# Altium PCB Mega2560_Custom.PcbDoc (part 1 of 6)
Units mil, origin at the board's own origin, x right, y up, seen from the top; angles counter-clockwise.
Board outline 4742.41 x 2889.95 mil, 2 copper layers (Top Layer, Bottom Layer), stack 57 mil thick; 215 components, 134 nets, 793 pads, 779 vias.
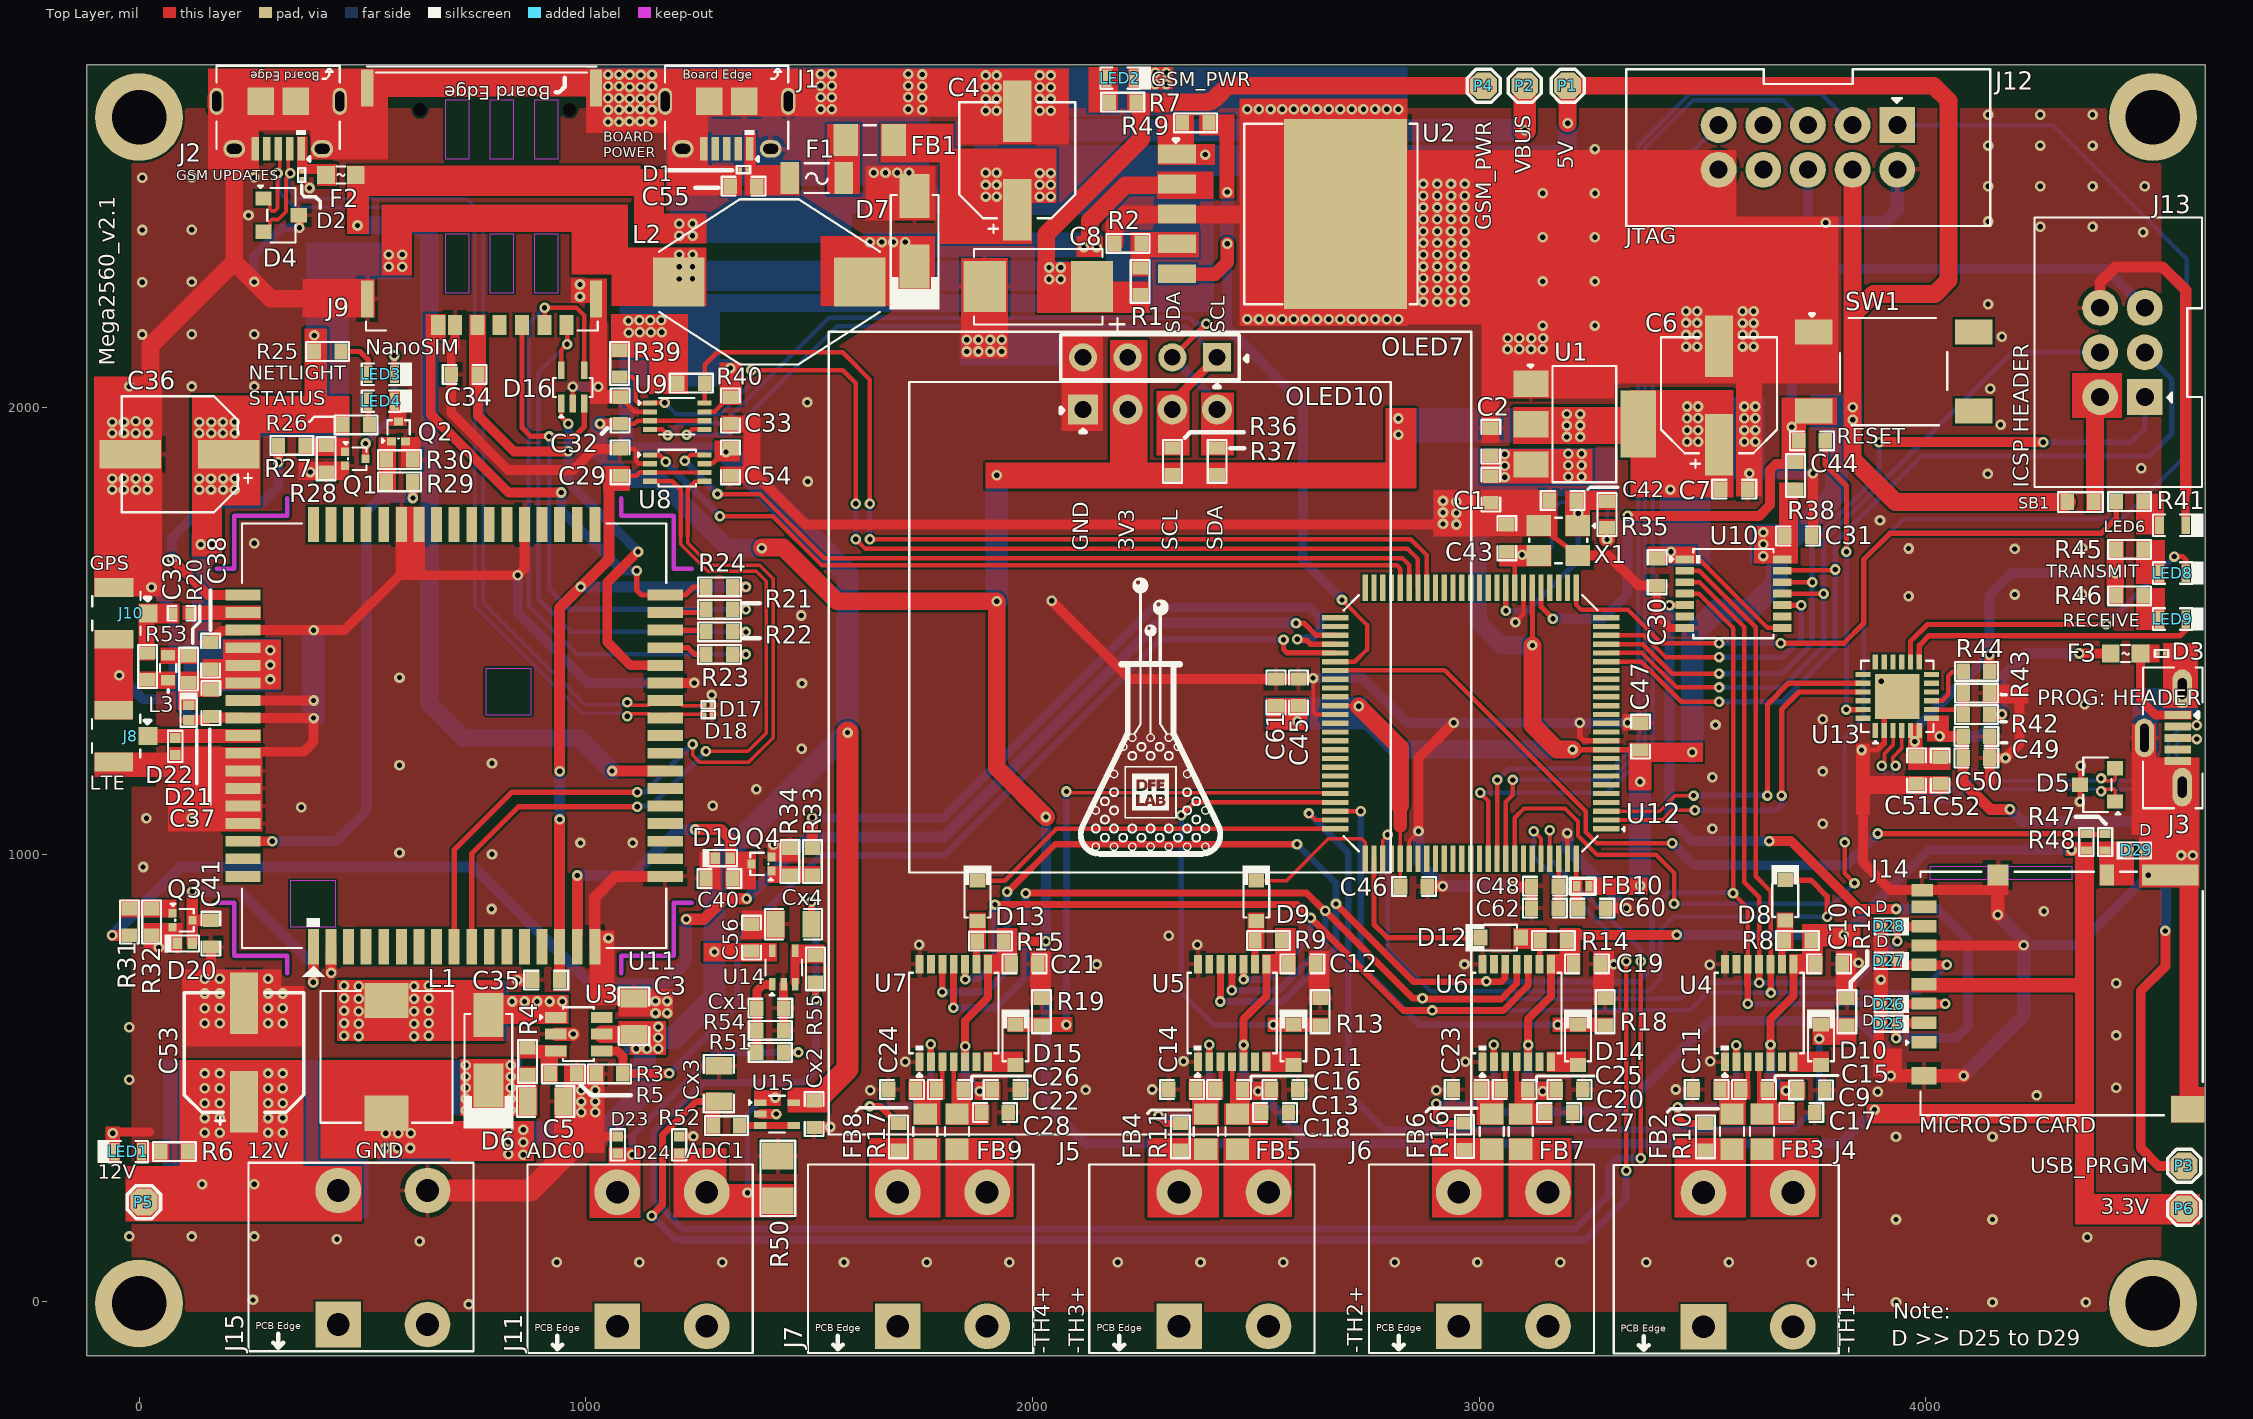
[diagram p0: Top Layer view]
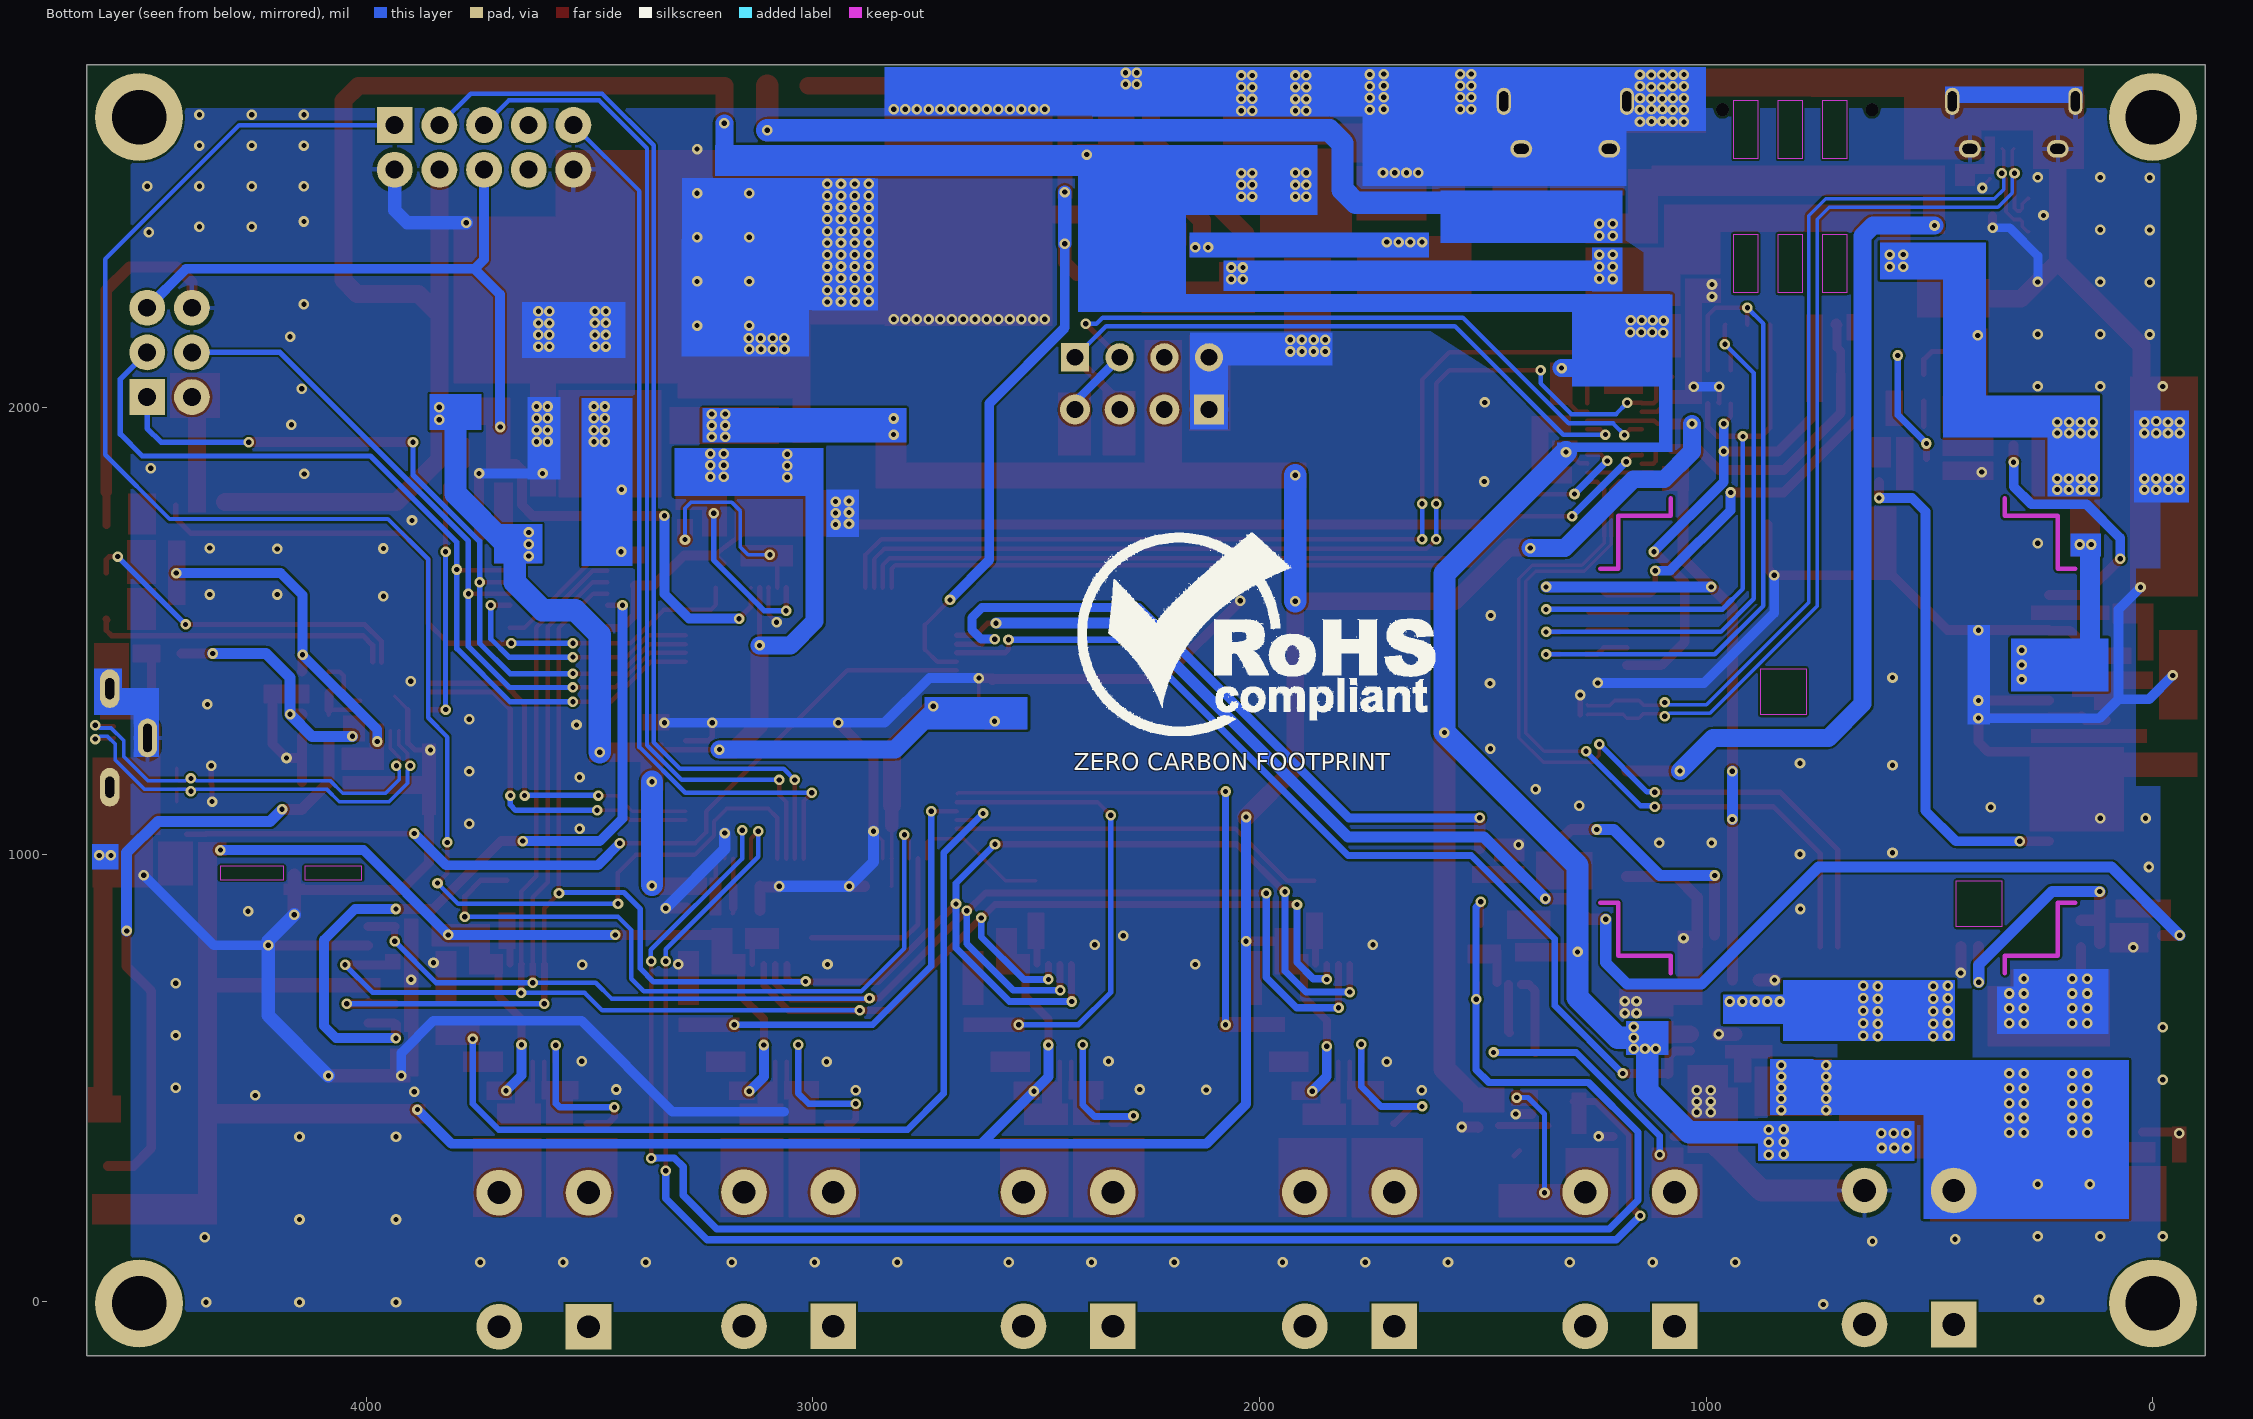
[diagram p1: Bottom Layer view, seen from below]
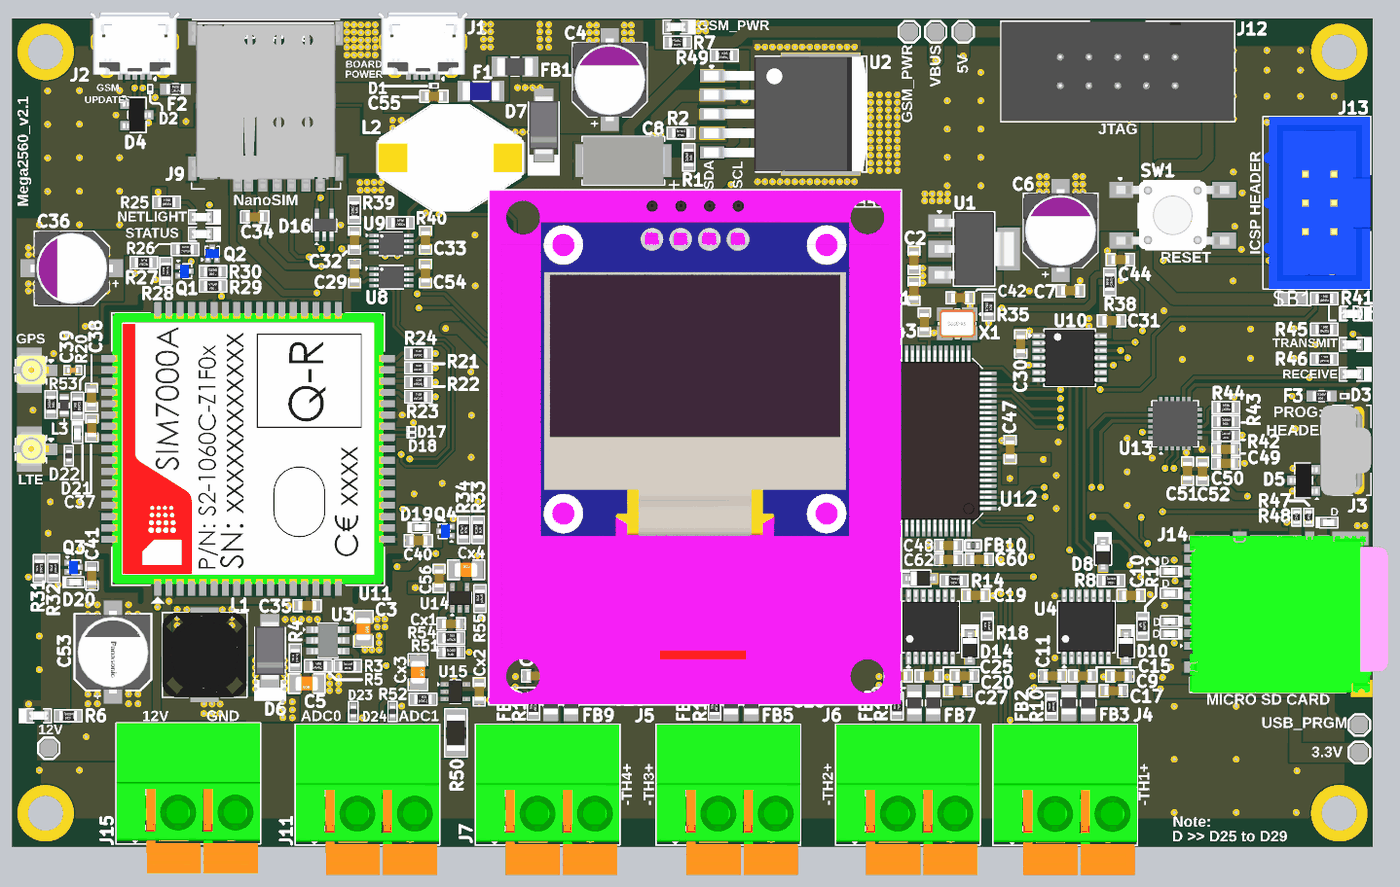
[diagram p4: 3D render of the assembled board from above, using the file's embedded part models]

## Layer stack, top to bottom
Top Solder: solder mask 3, Solder Resist, Dk 3.5
Top Layer: signal copper 10
Dielectric 1: dielectric 37, FR-4, Dk 4.8
Bottom Layer: signal copper 10
Bottom Solder: solder mask 3, Solder Resist, Dk 3.5

## Board outline
-117.18,-122 -117.18,2767.95 4625.23,2767.95 4625.23,-122

## Design rules (kind name [scope] priority, off if disabled: settings)
Clearance [All] p1: gap=5 ignorepadtopadclearanceinfootprint=FALSE except(4: Arc-SMDPad Track-SMDPad SMDPad-SMDPad)
ComponentClearance [All] p1: gap=0 collisioncheckmode=3 verticalgap=0 showdistances=FALSE
DiffPairsRouting DiffPairsRouting_1 [InDifferentialPairClass('USB_Lines')] p1: maxlimit=11 minlimit=11 mostfreqgap=11 toplayer_minwidth=8 toplayer_maxwidth=8 toplayer_prefwidth=8 bottomlayer_minwidth=8 bottomlayer_maxwidth=8 bottomlayer_prefwidth=8 impedanceprofiledriven=TRUE impedanceprofileid={DA70B034-A1D0-407E-8505-7706A3F1415D} impedanceprofilevalue=90.000000 maxuncoupledlength=500
DiffPairsRouting [InDifferentialPairClass('GSM_USB_Lines')] p2: maxlimit=11 minlimit=11 mostfreqgap=11 toplayer_minwidth=8 toplayer_maxwidth=8 toplayer_prefwidth=8 bottomlayer_minwidth=8 bottomlayer_maxwidth=8 bottomlayer_prefwidth=8 impedanceprofiledriven=TRUE impedanceprofileid={DA70B034-A1D0-407E-8505-7706A3F1415D} impedanceprofilevalue=90.000000 maxuncoupledlength=500
HoleSize [All] p1: absolutevalues=TRUE maxlimit=1000 minlimit=1 maxpercent=80.000 minpercent=20.000
HoleToHoleClearance [All] p1: gap=0 allowstackedmicrovias=TRUE
MatchedLengths "Schematic Matched Net Lengths_2" [InDifferentialPairClass('GSM_USB_Lines')] p1: tolerance=20 checknetsindiffpair=TRUE checkdiffpairvsdiffpair=FALSE checkxsignals=FALSE checkothers=FALSE
MatchedLengths "Schematic Matched Net Lengths" [InDifferentialPairClass('USB_Lines')] p2: tolerance=32 checknetsindiffpair=TRUE checkdiffpairvsdiffpair=FALSE checkxsignals=FALSE checkothers=FALSE
MaxMinImpedance "Schematic Impedance Constraint_2" [InNetClass('USB')] p1: minimum=85.00 maximum=90.00
MaxMinImpedance "Schematic Impedance Constraint" [InNetClass('GSM_USB')] p2: minimum=85.00 maximum=90.00
MinimumSolderMaskSliver [All] p1: minsoldermaskwidth=0
PolygonConnect [All] p1: thpad.connectstyle=Relief thpad.reliefconductorwidth=10 thpad.reliefentries=4 thpad.polygonreliefangle="90 Angle" thpad.airgapwidth=10 smdpad.connectstyle=Relief smdpad.reliefconductorwidth=10 smdpad.reliefentries=4 smdpad.polygonreliefangle="90 Angle" smdpad.airgapwidth=10 via.connectstyle=Direct via.reliefconductorwidth=10 via.reliefentries=4 via.polygonreliefangle="90 Angle" via.airgapwidth=10
RoutingVias [All] p1: holewidth=11.81 width=23.62 viastyle="Through Hole" minholewidth=11.81 minwidth=23.62 maxholewidth=11.81 maxwidth=23.62
SilkToSilkClearance [All] p1: silktosilkclearance=0
SilkToSolderMaskClearance [IsPad] p1: minsilkscreentomaskgap=0 clearancetoexposedcopper=TRUE
SolderMaskExpansion SolderMaskExpansion_1 [IsVia] p1: expansion=0 istentingtop=FALSE soldermaskfromhole=TRUE
SolderMaskExpansion [Not IsVia] p2: expansion=4 istentingtop=FALSE
Width [All] p1: maxlimit=100 minlimit=8 preferedwidth=22 minimp=50.000000 maximp=50.000000 favimp=50.000000
23 further rules are at their usual default settings.

## Classes and differential pairs
differential pair class USB_Lines: USB_D
differential pair class GSM_USB_Lines: GSM_USB.GSM_USB_D
net class USB: USB_D_N USB_D_P
net class GSM_USB: GSM_USB.GSM_USB_D_N GSM_USB.GSM_USB_D_P
component class U_USB-to-UART-Sheet: C49 C50 C51 C52 LED8 LED9 R42 R43 R44 R45 R46 U13
component class U_Thermocouple-Sheet: C9 C10 C11 C12 C13 C14 C15 C16 C17 C18 C19 C20 C21 C22 C23 C24 C25 C26 C27 C28 D8 D9 D10 D11 D12 D13 D14 D15 FB2 FB3 FB4 FB5 FB6 FB7 FB8 FB9 J4 J5 J6 J7 R8 R9 R10 R11 R12 R13 R14 R15 R16 R17 R18 R19 U4 U5 U6 U7
component class U_SDCard-Sheet: D25 D26 D27 D28 D29 J14 R47 R48
component class U_Power-Sheet: C1 C2 C3 C4 C5 C6 C7 C8 C53 C55 D1 D2 D3 D4 D5 D6 D7 F1 F2 F3 FB1 J1 J2 J3 J15 L1 L2 LED1 LED2 P1 P2 P3 P4 P5 P6 R1 R2 R3 R4 R5 R6 R7 R49 SS U1 U2 U3
component class U_Level-Shifter-Sheet: C29 C30 C31 C32 C33 C54 U8 U9 U10
component class U_GSM-Sheet: C34 C35 C36 C37 C38 C39 C40 C41 D16 D17 D18 D19 D20 D21 D22 J8 J9 J10 L3 LED3 LED4 Q1 Q2 Q3 Q4 R20 R21 R22 R23 R24 R25 R26 R27 R28 R29 R30 R31 R32 R33 R34 R53 U11
component class U_Controller-Sheet: C42 C43 C44 C45 C46 C47 C48 C56 C60 C61 C62 Cx1 Cx2 Cx3 Cx4 D23 D24 FB10 J11 J12 J13 LED6 OLED7 OLED10 R35 R36 R37 R38 R39 R40 R41 R50 R51 R52 R54 R55 SB1 SW1 U12 U14 U15 X1
differential pair USB_D: +USB_D_P -USB_D_N
differential pair GSM_USB.GSM_USB_D: +GSM_USB.GSM_USB_D_P -GSM_USB.GSM_USB_D_N

## Components (designator, comment, footprint, x,y, rotation, side; value= is the part's Value field where it differs from the comment)
C1 "10uF" Cap-0603 3026,1817 r90 top locked
C2 "100nF" Cap-0603 3026,1924 r270 top locked
C3 "22uF" Cap-0805 1108,638 r270 top locked
C4 "120uF" 20SVPF120M 1965.82,2553.95 r90 top locked
C5 "22uF" Cap-0805 910,447 r180 top locked
C6 "120uF" 20SVPF120M 3536.82,2027.95 r90 top locked
C7 "100nF" Cap-0603 3570.82,1817.95 r180 top locked
C8 "330uF" Case-D 2013,2271 r180 top locked
C9 "100nF" Cap-0603 3743,473 r180 top locked
C10 "100nF" Cap-0603 3783,755 r180 top locked
C11 "10nF" Cap-0603 3509,474 r0 top locked
C12 "100nF" Cap-0603 2604,755 r180 top locked
C13 "100nF" Cap-0603 2564,474 r180 top locked
C14 "10nF" Cap-0603 2335,474 r0 top locked
C15 "10nF" Cap-0603 3615,474 r0 top locked
C16 "10nF" Cap-0603 2440,474 r0 top locked
C17 "10nF" Cap-0603 3721,422 r0 top locked
C18 "10nF" Cap-0603 2543,422 r0 top locked
C19 "100nF" Cap-0603 3241,755 r180 top locked
C20 "100nF" Cap-0603 3202,474 r180 top locked
C21 "100nF" Cap-0603 1982,755 r180 top locked
C22 "100nF" Cap-0603 1940,474 r180 top locked
C23 "10nF" Cap-0603 2972,474 r0 top locked
C24 "10nF" Cap-0603 1708,474 r0 top locked
C25 "10nF" Cap-0603 3079,474 r0 top locked
C26 "10nF" Cap-0603 1815,474 r0 top locked
C27 "10nF" Cap-0603 3179,422 r0 top locked
C28 "10nF" Cap-0603 1916,422 r0 top locked
C29 "100nF" Cap-0603 1076.82,1877.95 r90 top locked
C30 "100nF" Cap-0603 3397.94,1631.83 r270 top locked
C31 "100nF" Cap-0603 3714,1713 r0 top locked
C32 "100nF" Cap-0603 1076.82,1993.95 r90 top locked
C33 "100nF" Cap-0603 1323.82,1993.95 r270 top locked
C34 "100nF" Cap-0603 728.82,2074.95 r0 top locked
C35 "100nF" Cap-0603 911.48,719 r0 top locked
C36 "120uF" 20SVPF120M 91,1896 r180 top locked
C37 "100nF" Cap-0603 161,1339 r270 top locked
C38 "1uF" Cap-0603 160,1445 r90 top locked
C39 "33pF" Cap-0402 95,1540 r180 top locked
C40 "100nF" Cap-0603 1299,946 r0 top locked
C41 "100nF" Cap-0603 161,823 r90 top locked
C42 "20pF" Cap-0603 3186.82,1792.95 r0 top locked
C43 "20pF" Cap-0603 3061.82,1707.95 r90 top locked
C44 "100nF" Cap-0603 3744.82,1925.95 r180 top locked
C45 "100nF" Cap-0603 2595,1362.95 r90 top locked
C46 "100nF" Cap-0603 2854,928.5 r0 top locked
C47 "100nF" Cap-0603 3361,1264 r90 top locked
C48 "100nF" Cap-0603 3147,929 r180 top locked
C49 "100nF" Cap-0603 4113,1264.5 r0 top locked
C50 "4.7uF" Cap-0603 4113,1216 r0 top locked
C51 "100nF" Cap-0603 3979.05,1188.42 r270 top locked
C52 "4.7uF" Cap-0603 4031.82,1187.95 r270 top locked
C53 "47uF" 25SVPF47M 234.59,556.95 r90 top locked
C54 "100nF" Cap-0603 1323.82,1877.95 r270 top locked
C55 "1uF" Cap-0603 1353.13,2496 r0 top locked
C56 "100nF" Cap-0603 1371,814 r90 top locked
C60 "10uF" Cap-0603 3253,880 r0 top locked
C61 "10uF" Cap-0603 2545,1362.95 r270 top locked
C62 "1uF" Cap-0603 3147,880 r180 top locked
Cx1 "100nF" Cap-0603 1413,656 r180 top locked
Cx2 "100nF" Cap-0603 1511,419 r270 top locked
Cx3 "2.2uF" Cap-0805 1298,487 r270 top locked
Cx4 "2.2uF" Cap-0805 1465,844 r0 top locked
D1 "PESD5V0H1BSFYL" DSN0603-2 1353.13,2533 r0 top locked
D2 "PESD5V0H1BSFYL" DSN0603-2 364,2521 r90 top locked
D3 "PESD5V0H1BSFYL" DSN0603-2 4527.13,1450 r180 top locked
D4 "ESD5302F-3/TR" Sot-23 318,2431 r270 top
D5 "ESD5302F-3/TR" Sot-23 4384,1156 r90 top locked
D6 "SS34" SMA 781.82,561.95 r90 top locked
D7 "SS32 /SMA(DO-214AC)" SMA 1736,2395 r90 top locked
D8 "1N4148WS-7-F" SOD-323 3685,897.28 r270 top locked
D9 "1N4148WS-7-F" SOD-323 2501,896.28 r270 top locked
D10 "1N4148WS-7-F" SOD-323 3765,574 r270 top locked
D11 "1N4148WS-7-F" SOD-323 2584,574 r270 top locked
D12 "1N4148WS-7-F" SOD-323 3047.72,814 r0 top locked
D13 "1N4148WS-7-F" SOD-323 1877,896.28 r270 top locked
D14 "1N4148WS-7-F" SOD-323 3221,574 r270 top locked
D15 "1N4148WS-7-F" SOD-323 1962,574 r270 top locked
D16 "ESDA6V1W5" SOT-323-5 970.82,2046.95 r90 top locked
D17 "PESD5V0H1BSFYL" DSN0603-2 1274.13,1335 r0 top locked
D18 "PESD5V0H1BSFYL" DSN0603-2 1274.13,1313 r0 top locked
D19 "ESD5651N-2/TR" DFN1006-2L_ 1306.45,991.95 r0 top locked
D20 "ESD5651N-2/TR" DFN1006-2L_ 102.45,800.95 r0 top locked
D21 "ESD5651N-2/TR" DFN1006-2L_ 111,1317.73 r270 top locked
D22 "LXES15AAA1-153" "Diode 0402" 81,1241.91 r270 top locked
D23 "PGB1010402KR" "Diode 0402" 1072,350 r90 top locked
D24 "PGB1010402KR" "Diode 0402" 1209,350 r90 top locked
D25 "ESD5451N-2/TR" DFN1006-2L_ 3917,621 r180 top locked
D26 "ESD5451N-2/TR" DFN1006-2L_ 3917,665 r180 top locked
D27 "ESD5451N-2/TR" DFN1006-2L_ 3917,762 r180 top locked
D28 "ESD5451N-2/TR" DFN1006-2L_ 3917,839 r180 top locked
D29 "ESD5451N-2/TR" DFN1006-2L_ 4471,1009 r0 top locked
F1 "1206L300SLTHYR" "Fuse 1206 (3216 Metric)" 1517,2514 r0 top locked
F2 "SMD0603-050" Fuse-0603 452,2521 r0 top locked
F3 "SMD0603-050" Fuse-0603 4446.82,1449.95 r180 top locked
FB1 "100MHz" IND-1206 1635.54,2599 r0 top locked
FB2 "MMZ2012R102ATD25" Ind-0805 3565.82,379.63 r90 top locked
FB3 "MMZ2012R102ATD25" Ind-0805 3633,379.63 r90 top locked
FB4 "MMZ2012R102ATD25" Ind-0805 2388,379.63 r90 top locked
FB5 "MMZ2012R102ATD25" Ind-0805 2459,379.63 r90 top locked
FB6 "MMZ2012R102ATD25" Ind-0805 3028,379.63 r90 top locked
FB7 "MMZ2012R102ATD25" Ind-0805 3093,379.63 r90 top locked
FB8 "MMZ2012R102ATD25" Ind-0805 1760,379.63 r90 top locked
FB9 "MMZ2012R102ATD25" Ind-0805 1831,379.63 r90 top locked
FB10 "BLM15PD121SN1D" IND-0402 3232,929 r180 top locked
J1 "10118194-0001LF" 10118194-0001LF_ 1315.45,2579.65 r180 top locked
J2 "10118194-0001LF" 10118194-0001LF_ 311.45,2579.65 r180 top locked
J3 "105133-0011" 1051330011 4531.34,1260.95 r270 top locked
J4 "HA0200500000G" HA0200500000G 3602,93 r0 top locked
J5 "HA0200500000G" HA0200500000G 2428.22,93.95 r0 top locked
J6 "HA0200500000G" HA0200500000G 3054.02,93.95 r0 top locked
J7 "HA0200500000G" HA0200500000G 1798.42,93.95 r0 top locked
J8 "U.FL-R-SMT-1(80)" U.FL-R-SMT-1(80)_ -18.18,1264.95 r90 top locked
J9 "XKNANO-113" XKNANO-113 766.97,2450.81 r180 top locked
J10 "U.FL-R-SMT-1(80)" U.FL-R-SMT-1(80)_ -17.82,1539.95 r90 top locked
J11 "HA0200500000G" HA0200500000G 1170.62,93.95 r0 top locked
J12 "BH254V-10P ( JTAG 2.54mm)" BH254V-10P 3735.82,2582.95 r180 top locked
J13 "ICSP" BH254V-6P 4439.82,2123.95 r90 top locked
J14 "DM3BT-DSF-PEJS" DM3BT-DSF-PEJS 4288.82,691.95 r90 top locked
J15 "HA0200500000G" HA0200500000G 545.82,97.95 r0 top locked
L1 "22uH" SMRH74-220MT 553.82,546.95 r90 top locked
L2 "22uH" SSL0804T-220M-N 1411,2282 r180 top locked
L3 "27nH" "IND-0603 (1608 Metric)" 65,1418 r270 top locked
LED1 "RED" LED-0603 -24.18,334.95 r180 top locked
LED2 "RED" LED-0603 2196.3,2737.95 r0 top locked
LED3 "RED" LED-0603 542.3,2074.95 r0 top locked
LED4 "Yellow" LED-0603 542.3,2014.95 r0 top locked
LED6 "Yellow" LED-0603 4552,1737 r0 top locked
LED8 "Yellow" LED-0603 4552,1630 r0 top locked
LED9 "Yellow" LED-0603 4552,1527 r0 top locked
OLED7 "DNP" ZIO-101954 2263,2113 r0 top locked
OLED10 "OLED 0.96\" inch i2C" "OLED 0.96\" inch i2C" 2263,1996 r0 top locked
P1 "TEST POINT" Test-point 3197.82,2720.95 r0 top locked
P2 "TEST POINT" Test-point 3101.82,2720.95 r0 top locked
P3 "TEST POINT" Test-point 4577.82,302.95 r0 top locked
P4 "TEST POINT" Test-point 3009.82,2720.95 r0 top locked
P5 "TEST POINT" Test-point 11,222 r0 top locked
P6 "TEST POINT" Test-point 4577.82,206.95 r0 top locked
Q1 "MMBT3904M" SOT-723 484,1886 r270 top locked
Q2 "MMBT3904M" SOT-723 581,1947 r0 top locked
Q3 "MMBT3904M" SOT-723 97.18,852.95 r270 top locked
Q4 "MMBT3904M" SOT-723 1393.18,978.95 r90 top locked
R1 "2.1K" Res-0603 2240.82,2282.95 r90 top locked
R2 "1K" Res-0603 2213.82,2367.95 r0 top locked
R3 "10K" Res-0603 1053,509 r0 top locked
R4 "62K" Res-0603 870,537 r270 top locked
R5 "3.16K" Res-0603 950,509 r180 top locked
R6 "1.2K" Res-0603 79,335 r0 top locked
R7 "180R" Res-0603 2202,2684 r0 top locked
R8 "10K" Res-0603 3712.77,807 r0 top locked
R9 "10K" Res-0603 2528,807 r0 top locked
R10 "2K" Res-0603 3506,368 r270 top locked
R11 "2K" Res-0603 2331,368 r270 top locked
R12 "10K" Res-0603 3823,648 r270 top locked
R13 "10K" Res-0603 2644,648 r270 top locked
R14 "10K" Res-0603 3166,807 r0 top locked
R15 "10K" Res-0603 1906,806 r0 top locked
R16 "2K" Res-0603 2967,369 r270 top
R17 "2K" Res-0603 1700,368 r270 top locked
R18 "10K" Res-0603 3282,648 r270 top locked
R19 "10K" Res-0603 2020,648 r270 top locked
R20 "10R" Res-0603 111,1415 r270 top locked
R21 "22R" Res-0603 1299.18,1548.62 r180 top locked
R22 "22R" Res-0603 1299.18,1498.28 r180 top locked
R23 "22R" Res-0603 1299.18,1447.95 r180 top locked
R24 "10K" Res-0603 1299.18,1598.95 r180 top locked
R25 "180R" Res-0603 422,2126 r180 top locked
R26 "180R" Res-0603 486,1962 r180 top locked
R27 "4.7K" Res-0603 342,1916 r180 top locked
R28 "47K" Res-0603 419,1886 r270 top locked
R29 "4.7K" Res-0603 583,1834 r0 top locked
R30 "47K" Res-0603 583,1884 r0 top locked
R31 "4.7K" Res-0603 -21.82,848.95 r270 top locked
R32 "47K" Res-0603 28.18,848.95 r270 top locked
R33 "4.7K" Res-0603 1507,984 r90 top locked
R34 "47K" Res-0603 1457,984 r90 top locked
R35 "1M" Res-0603 3286,1761 r90 top locked
R36 "4.7K" Res-0603 2313,1880 r270 top locked
R37 "4.7K" Res-0603 2413,1880 r270 top locked
R38 "10K" Res-0603 3708,1848 r270 top locked
R39 "10K" Res-0603 1076,2099 r90 top locked
R40 "10K" Res-0603 1236,2055 r180 top locked
R41 "470R" Res-0603 4456,1789.95 r180 top locked
R42 "22.1K" Res-0603 4113,1313 r0 top locked
R43 "47.5K" Res-0603 4113,1361.5 r0 top locked
R44 "1.2K" Res-0603 4113,1410 r180 top locked
R45 "470R" Res-0603 4456,1683 r180 top locked
R46 "470R" Res-0603 4456,1579 r180 top locked
R47 "22" Res-0402 4400.96,1027.76 r90 top locked
R48 "100K" Res-0402 4358.96,1027.76 r270 top locked
R49 "10K" Res-0603 2365,2638 r180 top locked
R50 "250R" Res-1206 1430,275 r270 top locked
R51 "3.3k" Res-0603 1413,557 r0 top locked
R52 "680R" Res-0603 1315,393 r180 top locked
R53 "0R" Res-0603 19,1421 r90 top locked
R54 "2.2K" Res-0603 1413,606.5 r180 top locked value=2.2kR
R55 "680R" Res-0603 1514,744 r270 top locked
SB1 "Solder Bridge" "Solder Bridge" 4345.82,1788.95 r180 top locked
SW1 "Tactile Switch" TL3301NF160QG 3927.82,2080.95 r0 top locked value=Custom
U1 "AZ1117CH-3.3TRG1" "SOT- 223" 3235.9,1963.5 r270 top locked
U2 "LM2596S-ADJ/NOPB" DDPAK 2511.94,2433.95 r270 top locked
U3 "MT3608" SOT-23-6 984,598 r0 top locked
U4 "MAX31856MUD+T" 14-TSSOP#1 3626.59,645.16 r90 top locked
U5 "MAX31856MUD+T" 14-TSSOP#1 2446.82,645.16 r90 top locked
U6 "MAX31856MUD+T" 14-TSSOP#1 3083.86,645.16 r90 top locked
U7 "MAX31856MUD+T" 14-TSSOP#1 1823.64,645.16 r90 top locked
U8 "TXB0102DCUT" VSSOP-8(2x2.3x0.5) 1204.82,1864.95 r0 top locked
U9 "TXS0102DCUR" 8-VSSOP 1204.82,1980.95 r0 top locked
U10 "TXB0104PWR" 14-TSSOP#2 3568.82,1583.95 r0 top locked
U11 "SIM7000A" SIM7000A 705.26,1265.99 r90 top locked
U12 "ATMEGA2560-16AU" TQFP-100(14x14) 2980.82,1293.8 r180 top locked
U13 "CP2102N-A02-GQFN24R" "24-QFN (4x4)" 3935.82,1353.95 r90 top locked
U14 "TLV9301IDCKR" SC-70-5 1443,747 r90 top locked
U15 "TLV9301IDCKR" SC-70-5 1428,419 r0 top locked
X1 "X322516MLB4SI" SMD3225-4P 3176.82,1702.95 r180 top locked

## Footprints (in the part's own frame and the unit in brackets; to place one, negate y for a bottom-side part, rotate by r counter-clockwise, add the part's x,y. Pads: shape width x height; smd on the part's side, far side on the other; paste and mask are expansions set on the pad)
8-VSSOP [mm]
  rect 0.8x0.3 smd: 1(-1.55,0.75) 2(-1.55,0.25) 3(-1.55,-0.25) 4(-1.55,-0.75) 5(1.55,-0.75) 6(1.55,-0.25) 7(1.55,0.25) 8(1.55,0.75)
  silkscreen extent -2.21,-1.04 0.97,1.04, body extent -1.55,-1 1.55,1, height 0.9
14-TSSOP#1 [mm]
  rect 1.05x0.45 smd: 1(-2.775,1.95) 2(-2.775,1.3) 3(-2.775,0.65) 4(-2.775,0) 5(-2.775,-0.65) 6(-2.775,-1.3) 7(-2.775,-1.95) 8(2.775,-1.95) 9(2.775,-1.3) 10(2.775,-0.65) 11(2.775,0) 12(2.775,0.65) 13(2.775,1.3) 14(2.775,1.95)
  silkscreen extent -3.58,-2.54 2.29,2.54, body extent -3.2,-2.5 3.2,2.5, height 1.2
14-TSSOP#2 [mm]
  rect 1.05x0.45 smd: 1(-2.775,1.95) 2(-2.775,1.3) 3(-2.775,0.65) 4(-2.775,0) 5(-2.775,-0.65) 6(-2.775,-1.3) 7(-2.775,-1.95) 8(2.775,-1.95) 10(2.775,-0.65) 11(2.775,0) 12(2.775,0.65) 13(2.775,1.3) 14(2.775,1.95) (2.775,-1.3)
  silkscreen extent -3.58,-2.54 2.29,2.54, body extent -3.2,-2.5 3.2,2.5, height 1.2
20SVPF120M [mm]
  rect 3.5x1.6 smd: 1(-2.8,0) 2(2.8,0)
  silkscreen extent -4.11,-3.3 3.3,3.3, body extent -3.65,-3.3 3.65,3.3, height 5.9
"24-QFN (4x4)" [mm]
  rect 0.85x0.3 smd: 1(-1.95,1.25) 2(-1.95,0.75) 3(-1.95,0.25) 4(-1.95,-0.25) 5(-1.95,-0.75) 6(-1.95,-1.25) 13(1.95,-1.25) 14(1.95,-0.75) 15(1.95,-0.25) 16(1.95,0.25) 17(1.95,0.75) 18(1.95,1.25)
  rect 0.3x0.85 smd: 7(-1.25,-1.95) 8(-0.75,-1.95) 9(-0.25,-1.95) 10(0.25,-1.95) 11(0.75,-1.95) 12(1.25,-1.95) 19(1.25,1.95) 20(0.75,1.95) 21(0.25,1.95) 22(-0.25,1.95) 23(-0.75,1.95) 24(-1.25,1.95)
  rect 2.55x2.55 smd: 25(0,0)
  silkscreen extent -2.67,-2.06 2.03,2.06, body extent -2,-2 2,2, height 0.8
25SVPF47M [mm]
  rect 3.5x1.6 smd: 1(-2.8,0) 2(2.8,0)
  silkscreen extent -4.11,-3.4 3.4,3.4, body extent -3.65,-3.3 3.65,3.3, height 6
10118194-0001LF_ [mm]
  rect 0.42x1.35 smd: 1(-1.3,0) 2(-0.65,0) 3(0,0) 4(0.65,0) 5(1.3,0)
  oval 1.25x1 hole 0.55 slot 0.85 at 0 deg: MH1(-2.5,0) MH2(2.5,0)
  oval 0.8x1.55 hole 0.5 slot 1.15 at 90 deg: MH3(-3.5,-2.7) MH4(3.5,-2.7)
  rect 1.5x1.55 smd: MP1(-1,-2.7) MP2(1,-2.7)
  Top Layer region: 193 vertices and 0 holes, not listed, extent -4,-3.475 -2.3,-1.92
  Top Layer region: 193 vertices and 0 holes, not listed, extent 2.3,-3.48 4,-1.925
  silkscreen extent -3.51,-4.72 3.51,0.71, body extent -4.02,-5.34 4.03,0.19, height 2.69
1051330011 [mm]
  rect 0.45x1.5 smd: 1(-1.3,0.825) 2(-0.65,0.825) 3(0,0.825) 4(0.65,0.825) 5(1.3,0.825)
  oval 2.2x1.1 hole 0.5 slot 1.2 at 0 deg: SH1(-2.8,1.075) SH2(2.8,1.075)
  oval 2.2x1.1 hole 0.5 slot 1.6 at 0 deg: SH3(0,-1.075)
  silkscreen extent -4,-1.15 4,2.23, body extent -4.01,-2.22 4.01,2.22, height 7.48
BH254V-6P [mm]
  rect 2.04x2.04 hole 1.02: 1(-2.54,-1.27)
  round 2.04 hole 1.02: 2(-2.54,1.27) 3(0,-1.27) 4(0,1.27) 5(2.54,-1.27) 6(2.54,1.27)
  silkscreen extent -7.65,-4.52 7.67,5, body extent -7.62,-4.47 7.62,4.97, height 9.1
BH254V-10P [mm]
  rect 2.04x2.04 hole 1.02: 1(-5.08,-1.27)
  round 2.04 hole 1.02: 2(-5.08,1.27) 3(-2.54,-1.27) 4(-2.54,1.27) 5(0,-1.27) 6(0,1.27) 7(2.54,-1.27) 8(2.54,1.27) 9(5.08,-1.27) 10(5.08,1.27)
  silkscreen extent -10.36,-4.45 10.34,4.47, body extent -10.3,-4.4 10.3,4.4, height 8.9
Cap-0402 [mil]
  rect 18x25 smd mask+2.36: 1(-18.5,0) 2(18.5,0)
  silkscreen extent -31,-16 31,16, body extent -20,-10 20,10, height 19
Cap-0603 [mil]
  rect 30x35 smd mask+2.36: 1(-30,0) 2(30,0)
  silkscreen extent -49,-21 49,21, body extent -32,-16 31,16, height 34
Cap-0805 [mil] "SMD 0805"
  rect 40x60 smd mask+2.76: 1(-40,0) 2(40,0)
  silkscreen extent -64,-34 64,34, body extent -39,-25 39,25, height 30
Case-D [mm]
  rect 2.4x2.9 smd: 1(-3.05,0) 2(3.05,0)
  silkscreen extent -4.9,-2.15 3.65,2.51, body extent -3.65,-2.16 3.65,2.14, height 4
DDPAK [mm]
  rect 1.07x2.16 smd mask+0.05: 1(-3.4,-4.797) 2(-1.7,-4.797) 3(0,-4.797) 4(1.7,-4.797) 5(3.4,-4.797)
  rect 10.8x6.99 smd mask+0.05: 6(0,4.798)
  silkscreen extent -5.13,-4.98 5.13,8.89, body extent -5.08,-5.52 5.08,8.83, height 4.75
DFN1006-2L_ [mm]
  rect 0.55x0.66 smd: 1(-0.425,0) 2(0.425,0)
  silkscreen extent -1.14,-0.51 0.81,0.51, body extent -0.5,-0.3 0.5,0.3, height 0.47
"Diode 0402" [mm]
  rect 0.58x0.6 smd: 1(-0.485,0) 2(0.485,0)
  silkscreen extent -0.89,-0.41 0.89,0.41, body extent -0.5,-0.25 0.5,0.25, height 0.5
DM3BT-DSF-PEJS [mm]
  rect 0.7x1.4 smd: 1(-2.85,7.45) 2(-1.75,7.45) 3(-0.65,7.45) 4(0.45,7.45) 5(1.55,7.45) 6(2.65,7.45) 7(3.75,7.45) 8(4.85,7.45)
  rect 1x1.4 smd: S1(-4.75,7.45)
  rect 1.2x1.2 smd: S2(6.65,3.25)
  rect 1.2x3.2 smd: S3(6.65,-6.55)
  rect 1.5x1.9 smd paste-2 mask+0: S4(-6.65,-7.55)
  rect 1.2x0.8 smd: SW-A(6.65,-2.95)
  rect 0.7x1.2 smd: SW-B(5.8,7.55)
  Top Layer region: -5.9,-7.85 -5.75,-8 -5.4,-8 -5.4,-8.5 -7.4,-8.5 -7.4,-6.6 -5.9,-6.6
  Keep-Out Layer region: 7.15,-0.95 6.4,-0.95 6.4,2.65 7.15,2.65
  Keep-Out Layer region: 7.15,3.85 6.4,3.85 6.4,7.1 7.15,7.1
  silkscreen extent -7,-8.4 6.85,8.46, body extent -6.98,-9.89 6.87,7.66, height 1.85
DSN0603-2 [mm]
  rect 0.2x0.24 smd mask+0.055: 1(-0.2,0) 2(0.2,0)
  silkscreen extent -0.38,-0.2 0.38,0.2, body extent -0.3,-0.15 0.3,0.15, height 0.32
"Fuse 1206 (3216 Metric)" [mm] "0.126\" L x 0.062\" W x 0.026\" H (3.20mm x 1.58mm x 0.65mm)"
  rect 1.06x1.82 smd: 1(-1.528,0) 2(1.528,0)
  silkscreen extent -0.68,-0.85 0.68,0.85, body extent -1.6,-0.79 1.6,0.79, height 0.85
Fuse-0603 [mm]
  rect 1x1 smd: 1(-0.85,0) 2(0.85,0)
  silkscreen extent -0.25,-0.48 0.25,0.48, body extent -0.77,-0.42 0.78,0.43, height 0.45
HA0200500000G [mm]
  rect 2.6x2.6 hole 1.3: 1(-2.54,-3.81)
  round 2.6 hole 1.3: 2(-2.54,3.81) 3(2.54,-3.81) 4(2.54,3.81)
  silkscreen extent -7.65,-5.33 5.16,5.38, body extent -7.59,-7.95 5.11,5.35, height 14.41
IND-0402 [mm]
  rect 0.4x0.6 smd: 1(-0.35,0) 2(0.35,0)
  silkscreen extent -0.71,-0.46 0.71,0.46, body extent -0.5,-0.25 0.5,0.25, height 0.25
"IND-0603 (1608 Metric)" [mm] "0.063\" L x 0.032\" W (1.60mm x 0.80mm)"
  rect 0.6x0.8 smd: 1(-0.7,0) 2(0.7,0)
  silkscreen extent -0.2,-0.46 0.23,0.46, body extent -0.8,-0.4 0.8,0.4, height 0.78
Ind-0805 [mm] "Inductor 0805"
  rect 1.2x1.32 smd: 1(-1,0) 2(1,0)
  silkscreen extent -0.25,-0.69 0.25,0.69, body extent -1,-0.62 1,0.63, height 0.47
IND-1206 [mm]
  rect 1.4x1.82 smd: 1(-1.36,0) 2(1.36,0)
  silkscreen extent -0.34,-0.85 0.34,0.85, body extent -1.6,-0.8 1.6,0.8, height 1.3
LED-0603 [mm]
  rect 0.5x1 smd: 1(-0.75,0) 2(0.75,0)
  silkscreen extent -1.12,-0.66 1.75,0.66, body extent -0.82,-0.37 0.82,0.36, height 0.68
"OLED 0.96\" inch i2C" [mm]
  rect 1.7x1.7 hole 0.95: 1(-3.81,0)
  round 1.7 hole 0.95: 2(-1.27,0) 3(1.27,0) 4(3.81,0)
  silkscreen extent -13.69,-26.31 13.69,1.57, body extent -13.65,-26.28 13.65,1.52, height 14.81
Res-0402 [mil]
  rect 18x25 smd mask+2.17: 1(-18.5,0) 2(18.5,0)
  silkscreen extent -32,-17 32,16, body extent -23,-11 23,11, height 16
Res-0603 [mil]
  rect 30x35 smd: 1(-30,0) 2(30,0)
  silkscreen extent -48,-21 48,21, body extent -31,-17 31,17, height 18
Res-1206 [mil]
  rect 60x70 smd: 1(-50,0) 2(50,0)
  silkscreen extent -84,-39 84,39, body extent -63,-31 63,31, height 24
SC-70-5 [mm]
  rect 0.73x0.38 smd: 1(-0.95,0.65) 2(-0.95,0) 3(-0.95,-0.65) 4(0.95,-0.65) 5(0.95,0.65)
  silkscreen extent -1.57,-1.04 0.46,1.04, body extent -1.05,-1 1.05,1, height 0.95
SIM7000A [mm]
  rect 2x0.62 smd: 1(-12,8) 2(-12,7) 3(-12,6) 4(-12,5) 5(-12,4) 6(-12,3) 7(-12,2) 8(-12,1) 9(-12,0) 10(-12,-1) 11(-12,-2) 12(-12,-3) 13(-12,-4) 14(-12,-5) 15(-12,-6) 16(-12,-7) 17(-12,-8) 35(12,-8) 36(12,-7) 37(12,-6) 38(12,-5) 39(12,-4) 40(12,-3) 41(12,-2) 42(12,-1) 43(12,0) 44(12,1) 45(12,2) 46(12,3) 47(12,4) 48(12,5) 49(12,6) 50(12,7) 51(12,8)
  rect 0.62x2 smd: 18(-8,-12) 19(-7,-12) 20(-6,-12) 21(-5,-12) 22(-4,-12) 23(-3,-12) 24(-2,-12) 25(-1,-12) 26(0,-12) 27(1,-12) 28(2,-12) 29(3,-12) 30(4,-12) 31(5,-12) 32(6,-12) 33(7,-12) 34(8,-12) 52(8,12) 53(7,12) 54(6,12) 55(5,12) 56(4,12) 57(3,12) 58(2,12) 59(1,12) 60(0,12) 61(-1,12) 62(-2,12) 63(-3,12) 64(-4,12) 65(-5,12) 66(-6,12) 67(-7,12) 68(-8,12)
  Keep-Out Layer region: -10.873,6.731 -8.257,6.731 -8.257,9.322 -10.873,9.322
  Keep-Out Layer region: 1.192,-4.394 3.808,-4.394 3.808,-1.803 1.192,-1.803
  Keep-Out Layer lines w0.254: -9.5,13.5 -9.5,12.5 -12.5,12.5 -12.5,9.5 -13.5,9.5 ; 9.5,13.5 9.5,12.5 12.5,12.5 12.5,9.5 13.5,9.5 ; -13.5,-9.5 -12.5,-9.5 -12.5,-12.5 -9.5,-12.5 -9.5,-13.5 ; 13.5,-9.5 12.5,-9.5 12.5,-12.5 9.5,-12.5 9.5,-13.5
  silkscreen extent -13.7,-12.07 12.07,12.07, body extent -11.99,-12 12.01,12, height 2.9
SMA [mm]
  rect 2.5x1.7 smd: 1(-2,0) 2(2,0)
  silkscreen extent -4.45,-1.42 2.06,1.42, body extent -2.6,-1.3 2.6,1.3, height 2.4
SMD3225-4P [mm]
  rect 1.4x1.2 smd: 1(-1.1,-0.85) 2(1.1,-0.85) 3(1.1,0.85) 4(-1.1,0.85)
  silkscreen extent -2.08,-1.3 1.65,1.3, body extent -1.6,-1.25 1.6,1.25, height 0.81
SMRH74-220MT [mm]
  rect 2x2.5 smd: 1(-3.2,0) 2(3.2,0)
  silkscreen extent -3.75,-3.75 3.75,3.75, body extent -3.74,-3.76 3.76,3.74, height 4.52
SOD-323 [mm]
  rect 0.8x0.9 smd mask+0.055: 1(-1.15,0) 2(1.15,0)
  silkscreen extent -2.01,-0.79 0.94,0.79, body extent -1.3,-0.67 1.3,0.67, height 1.1
"Solder Bridge" [mil] "Solder Bridge ON"
  rect 30x35 smd: 1(-30,0) 2(30,0)
  silkscreen extent -50,-22 50,22
Sot-23 [mm] "TRANS NPN 40V 0.6A SOT23"
  rect 0.82x0.92 smd: 1(-0.95,-1) 2(0.95,-1) 3(0,1)
  silkscreen extent -1.68,-1.3 1.55,0.81, body extent -1.5,-1.25 1.5,1.25, height 1.05
SOT-23-6 [mm]
  rect 1.22x0.62 smd: 1(-1.31,0.95) 2(-1.31,0) 3(-1.31,-0.95) 4(1.31,-0.95) 5(1.31,0) 6(1.31,0.95)
  silkscreen extent -2.18,-1.52 0.86,1.52, body extent -1.5,-1.5 1.5,1.5, height 1.47
SOT-323-5 [mm]
  rect 1x0.35 smd: 1(-0.95,0.65) 2(-0.95,0) 3(-0.95,-0.65) 4(0.95,-0.65) 5(0.95,0.65)
  silkscreen extent -1.73,-1.12 0.51,1.12, body extent -1.05,-1.05 1.05,1.05, height 1
SOT-723 [mm]
  rect 0.5x0.45 smd: 1(-0.4,-0.575) 2(0.4,-0.575) 3(0,0.575)
  silkscreen extent -0.94,-0.66 0.64,0.64, body extent -0.6,-0.6 0.6,0.6, height 0.5
"SOT- 223" [mm]
  rect 1.5x2 smd: 1(-2.3,-3.05) 2(0,-3.05) 3(2.3,-3.05)
  rect 3.8x2 smd: 4(0,3.05)
  silkscreen extent -3.35,-3.2 3.3,1.8, body extent -3.25,-3.5 3.25,3.5, height 1.61
SSL0804T-220M-N [mm]
  rect 2.92x2.79 smd: 1(-5.145,0) 2(5.145,0)
  silkscreen extent -6.27,-4.7 6.27,4.7, body extent -6.48,-4.7 6.48,4.7, height 4.9
Test-point [mil]
  oct 60x60 smd: 1(0,0)
  silkscreen extent -37,-37 37,37
TL3301NF160QG [mm]
  rect 2.12x1.42 smd: 1(-4.55,2.25) 2(4.55,2.25) 3(-4.55,-2.25) 4(4.55,-2.25)
  silkscreen extent -4.78,-3.05 3.05,3.28, body extent -5,-3 5,3, height 4.41
TQFP-100(14x14) [mm]
  rect 1.5x0.3 smd: 1(-7.7,6) 2(-7.7,5.5) 3(-7.7,5) 4(-7.7,4.5) 5(-7.7,4) 6(-7.7,3.5) 7(-7.7,3) 8(-7.7,2.5) 9(-7.7,2) 10(-7.7,1.5) 11(-7.7,1) 12(-7.7,0.5) 13(-7.7,0) 14(-7.7,-0.5) 15(-7.7,-1) 16(-7.7,-1.5) 17(-7.7,-2) 18(-7.7,-2.5) 19(-7.7,-3) 20(-7.7,-3.5) 21(-7.7,-4) 22(-7.7,-4.5) 23(-7.7,-5) 24(-7.7,-5.5) 25(-7.7,-6) 51(7.7,-6) 52(7.7,-5.5) 53(7.7,-5) 54(7.7,-4.5) 55(7.7,-4) 56(7.7,-3.5) 57(7.7,-3) 58(7.7,-2.5) 59(7.7,-2) 60(7.7,-1.5) 61(7.7,-1) 62(7.7,-0.5) 63(7.7,0) 64(7.7,0.5) 65(7.7,1) 66(7.7,1.5) 67(7.7,2) 68(7.7,2.5) 69(7.7,3) 70(7.7,3.5) 71(7.7,4) 72(7.7,4.5) 73(7.7,5) 74(7.7,5.5) 75(7.7,6)
  rect 0.3x1.5 smd: 26(-6,-7.7) 27(-5.5,-7.7) 28(-5,-7.7) 29(-4.5,-7.7) 30(-4,-7.7) 31(-3.5,-7.7) 32(-3,-7.7) 33(-2.5,-7.7) 34(-2,-7.7) 35(-1.5,-7.7) 36(-1,-7.7) 37(-0.5,-7.7) 38(0,-7.7) 39(0.5,-7.7) 40(1,-7.7) 41(1.5,-7.7) 42(2,-7.7) 43(2.5,-7.7) 44(3,-7.7) 45(3.5,-7.7) 46(4,-7.7) 47(4.5,-7.7) 48(5,-7.7) 49(5.5,-7.7) 50(6,-7.7) 76(6,7.7) 77(5.5,7.7) 78(5,7.7) 79(4.5,7.7) 80(4,7.7) 81(3.5,7.7) 82(3,7.7) 83(2.5,7.7) 84(2,7.7) 85(1.5,7.7) 86(1,7.7) 87(0.5,7.7) 88(0,7.7) 89(-0.5,7.7) 90(-1,7.7) 91(-1.5,7.7) 92(-2,7.7) 93(-2.5,7.7) 94(-3,7.7) 95(-3.5,7.7) 96(-4,7.7) 97(-4.5,7.7) 98(-5,7.7) 99(-5.5,7.7) 100(-6,7.7)
  silkscreen extent -8.74,-7.29 7.21,7.29, body extent -8.01,-8.01 8.01,8.01, height 1.1
U.FL-R-SMT-1(80)_ [mm]
  rect 1.02x1.07 smd: 1(0,-0.974)
  rect 1.07x2.2 smd: 2(1.475,0.974) 3(-1.475,0.974)
  silkscreen extent -1.22,-1.09 1.22,2.21, body extent -1.47,-0.74 1.53,2.36, height 1.2
VSSOP-8(2x2.3x0.5) [mm]
  rect 0.8x0.3 smd: 1(-1.55,0.75) 2(-1.55,0.25) 3(-1.55,-0.25) 4(-1.55,-0.75) 5(1.55,-0.75) 6(1.55,-0.25) 7(1.55,0.25) 8(1.55,0.75)
  silkscreen extent -2.24,-1.04 1.07,1.04, body extent -1.55,-1 1.55,1, height 0.88
XKNANO-113 [mm]
  rect 0.7x2.1 smd: 1(-6.5,5.26) 2(6.5,5.26) 3(6.5,-6.74) 4(-6.5,-6.74)
  rect 0.8x1.14 smd: C1(0.25,6.74) C2(-2.29,6.74) C3(-4.83,6.74) C5(1.52,6.74) C6(-1.02,6.74) C7(-3.56,6.74) CD(2.47,6.74)
  rect 0x0 hole 0.75 unplated: MH(-5,-5.49) MH(3.5,-5.49)
  Keep-Out Layer region: -4.366,-6.029 -2.995,-6.029 -2.995,-2.701 -4.366,-2.701
  Keep-Out Layer region: -1.826,-6.029 -0.455,-6.029 -0.455,-2.701 -1.826,-2.701
  Keep-Out Layer region: 0.714,-6.029 2.085,-6.029 2.085,-2.701 0.714,-2.701
  Keep-Out Layer region: -4.366,1.591 -2.995,1.591 -2.995,4.919 -4.366,4.919
  Keep-Out Layer region: -1.826,1.591 -0.455,1.591 -0.455,4.919 -1.826,4.919
  Keep-Out Layer region: 0.714,1.591 2.085,1.591 2.085,4.919 0.714,4.919
  silkscreen extent -6.6,-7.95 6.58,7.06, body extent -6.55,-7.57 6.54,7.01, height 1.37
ZIO-101954 [mm] "ZIO QWIIC 1.5INCH OLED DISPLAY"
  rect 1.6x1.6 hole 0.95: 1(3.81,0)
  round 1.6 hole 0.95: 2(1.27,0) 3(-1.27,0) 4(-3.81,0)
  silkscreen extent -18.26,-44.2 18.26,1.45, body extent -18.22,-44.15 18.22,1.4, height 15

## Part data
C1 C60 C61: library part CC0603KRX5R7BB106, "CAP CER 10UF 16V X5R 0603", Case Code (Imperial)=0603, Case Code (Metric)=1608, LCSC Part Number=C2936601, Manufacturer=Yageo, Max Operating Temperature=85°C, Min Operating Temperature=-55°C, Supplier Part Number 1=311-3486-1-ND, Tolerance=10%, Voltage Rating=16V, Capacitance=10uF, Case/Package=0603, Category="Ceramic Capacitors", ComponentLink1Description=http://www.yageo.com/documents/recent/UPY-GPHC_X5R_4V-to-50V_25.pdf?src-supplier=Digi-Key, ComponentLink1URL=http://www.yageo.com/documents/recent/UPY-GPHC_X5R_4V-to-50V_25.pdf?src-supplier=Digi-Key, Item Type=Capacitor, Manufacturer Part Number=CC0603KRX5R7BB106, Mount="Surface Mount", Packaging="Cut Tape", Pricing 1="1=0.68000, 10=0.48000, 50=0.36300, 100=0.31610, 500=0.23416, 1000=0.19903 (USD)", RoHS=Yes, RoHS Compliant=Yes, Stock 1=240725, Supplier 1=Digi-Key
C2 C7 C9 C10 C12 C13 C19 C20 C21 C22 C29 C30 C31 C32 C33 C34 C35 C37 C40 C41 C44 C45 C46 C47 C48 C49 C51 C54 C56 Cx1 Cx2: library part CC0603KRX5R9BB104, "CAP CER 0.1UF 50V X5R 0603", Case Code (Imperial)=0603, Case Code (Metric)=1608, Dielectric=X5R, LCSC Part Number=C110022, Manufacturer=Yageo, Max Operating Temperature=85°C, Min Operating Temperature=-55°C, Package Quantity=4000, Supplier Part Number 1=311-4046-1-ND, Tolerance=10%, Voltage Rating=50V, Capacitance=100nF, Case/Package=0603, Category="Ceramic Capacitors", ComponentLink1Description=http://www.mouser.com/ds/2/447/Yageo_UPY-GP_NP0_16V-to-50V_9-358835.pdf?src-supplier=Mouser, ComponentLink1URL=http://www.mouser.com/ds/2/447/Yageo_UPY-GP_NP0_16V-to-50V_9-358835.pdf?src-supplier=Mouser, ComponentLink2Description=https://www.yageo.com/upload/media/product/productsearch/datasheet/mlcc/UPY-GPHC_X5R_4V-to-50V_26.pdf?src-supplier=Digi-Key, ComponentLink2URL=https://www.yageo.com/upload/media/product/productsearch/datasheet/mlcc/UPY-GPHC_X5R_4V-to-50V_26.pdf?src-supplier=Digi-Key, ComponentLink3Description=http://www.yageo.com/exep/pages/download/literatures/ProductSelectionGuide%202014_Final_2.pdf?src-supplier=Digi-Key, ComponentLink3URL=http://www.yageo.com/exep/pages/download/literatures/ProductSelectionGuide%202014_Final_2.pdf?src-supplier=Digi-Key, Halogen Free="Halogen Free", Item Type=Capacitor, Lead Free="Lead Free", Length=0.063inch, Manufacturer Part Number=CC0603KRX5R9BB104, Mount="Surface Mount", Packaging="Tape and Reel", Pricing 1="1=0.10000, 10=0.05200, 50=0.02820, 100=0.02310, 500=0.01648, 1000=0.01294 (USD)", RoHS=Yes, Stock 1=152253, Supplier 1=Digi-Key, Termination=SMD/SMT, Thickness=0.035inch, Voltage Rating (DC)=50V, Weight=7.1E-05oz, Width=0.031inch
C3 C5: library part CS2012X5R226M250NRE, "25V 22uF X5R ±20% 0805 Multilayer Ceramic Capacitors MLCC - SMD/SMT ROHS", LCSC Part Number=C513764, Manufacturer=Samwha, Package=0805, ComponentLink1Description=LCSC, ComponentLink1URL=https://www.lcsc.com/product-detail/Multilayer-Ceramic-Capacitors-MLCC-SMD-SMT_Samwha-span-style-background-color-ff0-Capacitor-span-CS2012X5R226M250NRE_C513764.html, Item Type=Capacitor, Manufacturer Part Number=CS2012X5R226M250NRE
C4 C6 C36: library part 20SVPF120M, "CAP ALUM POLY 120UF 20% 20V SMD", Case/Package=Radial, ESR (Equivalent Series Resistance)=25mR, LCSC Part Number=C186713, Leakage Current=480uA, Manufacturer=Panasonic, Max Operating Temperature=105°C, Min Operating Temperature=-55°C, Package Quantity=1000, Ripple Current=3.2A, Supplier Part Number 1=P16498CT-ND, Tolerance=20%, Voltage=20V, Capacitance=120uF, Category="Aluminum Electrolytic Capacitors", ComponentLink1Description=https://datasheet.ciiva.com/24432/svpf-series-datasheet-24432811.pdf?src-supplier=Onlinecomponents.com, ComponentLink1URL=https://datasheet.ciiva.com/24432/svpf-series-datasheet-24432811.pdf?src-supplier=Onlinecomponents.com, ComponentLink2Description=https://datasheet.ciiva.com/25746/1734360-25746680.pdf?src-supplier=Farnell, ComponentLink2URL=https://datasheet.ciiva.com/25746/1734360-25746680.pdf?src-supplier=Farnell, ComponentLink3Description=https://datasheet.ciiva.com/22746/1734360-22746206.pdf?src-supplier=Element14, ComponentLink3URL=https://datasheet.ciiva.com/22746/1734360-22746206.pdf?src-supplier=Element14, ComponentLink4Description=https://datasheet.ciiva.com/46650/70324301-46650876.pdf?src-supplier=Allied+Electronics, ComponentLink4URL=https://datasheet.ciiva.com/46650/70324301-46650876.pdf?src-supplier=Allied+Electronics, Construction=Cylindrical, Diameter=6.3mm, Dissipation Factor=12%, Height=5.9mm, Height - Seated (Max)=0.236inch, Item Type=Capacitor, Lead Free="Lead Free", Length=5.9mm, Life (Hours)=5000Hour, Manufacturer Part Number=20SVPF120M, Material=Polymer, Mount="Surface Mount", Number of Pins=6, Packaging="Tape and Reel", Polarity=Polar, Pricing 1="1=1.45000, 10=1.14300, 50=0.99020, 100=0.85700, 500=0.64748 (USD)", Radiation Hardening=No, Reach SVHC Compliant=Yes, Ripple Current (AC)=3.2A, RoHS=Yes, RoHS Compliant=Yes, Series="OS-CON™, SVPF", Stock 1=50150, Supplier 1=Digi-Key, Termination=SMD/SMT, Voltage Rating=20V, Voltage Rating (DC)=20V
C8: library part 6TPB330ML, "CAP TANT POLY 330UF 6.3V 2917", Case Code (Imperial)=2917, Case Code (Metric)=7343, ESR (Equivalent Series Resistance)=40mR, LCSC Part Number=C236293, Leakage Current=207.9uA, Manufacturer=Panasonic, Max Operating Temperature=105°C, Min Operating Temperature=-55°C, Package Quantity=2500, Ripple Current=2A, Tolerance=20%, Voltage=6.3V, Capacitance=330uF, Case/Package=2917, Category="Polymer Capacitors", ComponentLink1Description=https://datasheet.ciiva.com/48675/aaa8000ce6-48675081.pdf?src-supplier=Avnet, ComponentLink1URL=https://datasheet.ciiva.com/48675/aaa8000ce6-48675081.pdf?src-supplier=Avnet, ComponentLink2Description=https://datasheet.ciiva.com/22745/1734361-22745320.pdf?src-supplier=Element14, ComponentLink2URL=https://datasheet.ciiva.com/22745/1734361-22745320.pdf?src-supplier=Element14, ComponentLink3Description=https://datasheet.ciiva.com/25785/1734361-25785833.pdf?src-supplier=Farnell, ComponentLink3URL=https://datasheet.ciiva.com/25785/1734361-25785833.pdf?src-supplier=Farnell, Construction=Flat, Depth=4.3mm, Dissipation Factor=10%, Features="General Purpose", Height=2.8mm, Height - Seated (Max)=0.118inch, Item Type=Capacitor, Lead Free="Lead Free", Length=7.3mm, Manufacturer Part Number=6TPB330ML, Mount="Surface Mount", Packaging="Tape and Reel", Polarity=Polar, Pricing 1="1=2.17610, 10=1.72910, 25=1.72430, 100=1.31060, 250=1.29750, 500=0.96850, 1000=0.83640, 3000=0.77310, 6000=0.74930 (USD)", Radiation Hardening=No, Reach SVHC Compliant=Yes, RoHS=Yes, RoHS Compliant=Yes, Series="POSCAP™ TPB", Stock 1=6258, Supplier 1="Arrow Electronics", Supplier Part Number 1=6TPB330ML, Termination=SMD/SMT, Voltage Rating=6.3V, Voltage Rating (DC)=6.3V, Width=4.3mm
C11 C14 C15 C16 C17 C18 C23 C24 C25 C26 C27 C28: library part CC0603KRX7R7BB103, "CAP CER 10000PF 16V X7R 0603", Case Code (Imperial)=0603, Case Code (Metric)=1608, Dielectric=X7R, LCSC Part Number=C519406, Manufacturer=Yageo, Max Operating Temperature=125°C, Min Operating Temperature=-55°C, Resistor Type=Ceramic, Tolerance=10%, Voltage Rating=16V, Capacitance=10nF, Case/Package=0603, Category="Ceramic Capacitors", ComponentLink1Description=https://datasheet.ciiva.com/7978/1489800-7978139.pdf?src-supplier=Element14, ComponentLink1URL=https://datasheet.ciiva.com/7978/1489800-7978139.pdf?src-supplier=Element14, Construction=Flat, Depth=0.8mm, Halogen Free="Halogen Free", Height=0.8mm, Item Type=Capacitor, Lead Free="Lead Free", Length=1.6mm, Manufacturer Part Number=CC0603KRX7R7BB103, Mount="Surface Mount", Packaging="Tape and Reel", Pricing 1="1=0.03600 (USD)", Radiation Hardening=No, RoHS=Yes, RoHS Compliant=Yes, Series=CC, Stock 1=3, Supplier 1="Arrow Electronics", Supplier Part Number 1=CC0603KRX7R7BB103, Termination=SMD/SMT, Thickness=0.035inch, Voltage Rating (DC)=16V, Width=0.8mm
C38 C55 C62: library part CC0603KRX5R8BB105, "CAP CER 1UF 25V X5R 0603", Case Code (Imperial)=0603, Case Code (Metric)=1608, Dielectric=X5R, LCSC Part Number=C14664, Manufacturer=Yageo, Max Operating Temperature=85°C, Min Operating Temperature=-55°C, Package Quantity=1, Supplier Part Number 1=311-1445-1-ND, Tolerance=10%, Voltage Rating=25V, Capacitance=1uF, Case/Package=0603, Category="Ceramic Capacitors", ComponentLink1Description=https://datasheet.ciiva.com/176/mlccorderingcode-176785.pdf?src-supplier=Digi-Key, ComponentLink1URL=https://datasheet.ciiva.com/176/mlccorderingcode-176785.pdf?src-supplier=Digi-Key, ComponentLink2Description=https://datasheet.ciiva.com/176/mlccorderingcode-176786.pdf?src-supplier=Digi-Key, ComponentLink2URL=https://datasheet.ciiva.com/176/mlccorderingcode-176786.pdf?src-supplier=Digi-Key, ComponentLink3Description=https://datasheet.ciiva.com/176/mlccorderingcode-176787.pdf?src-supplier=Digi-Key, ComponentLink3URL=https://datasheet.ciiva.com/176/mlccorderingcode-176787.pdf?src-supplier=Digi-Key, ComponentLink4Description=https://datasheet.ciiva.com/17436/upy-gphc-x5r-4v-to-50v-12-17436952.pdf?src-supplier=Avnet+Europe, ComponentLink4URL=https://datasheet.ciiva.com/17436/upy-gphc-x5r-4v-to-50v-12-17436952.pdf?src-supplier=Avnet+Europe, ComponentLink5Description=https://datasheet.ciiva.com/7978/1525783-7978171.pdf?src-supplier=Element14, ComponentLink5URL=https://datasheet.ciiva.com/7978/1525783-7978171.pdf?src-supplier=Element14, ComponentLink6Description=https://datasheet.ciiva.com/11586/upy-gphc-x5r-4v-to-50v-12-11586318.pdf?src-supplier=Avnet, ComponentLink6URL=https://datasheet.ciiva.com/11586/upy-gphc-x5r-4v-to-50v-12-11586318.pdf?src-supplier=Avnet, Construction=Flat, Depth=0.8mm, Halogen Free="Halogen Free", Height=0.8mm, Item Type=Capacitor, Lead Free="Lead Free", Length=1.6mm, Manufacturer Part Number=CC0603KRX5R8BB105, Mount="Surface Mount", Number of Pins=2, Packaging="Tape and Reel", Pricing 1="1=0.12000, 10=0.08400, 50=0.04760, 100=0.03940, 500=0.02764, 1000=0.02288 (USD)", Radiation Hardening=No, REACH SVHC="No SVHC", RoHS=Yes, RoHS Compliant=Yes, Series=CC, Stock 1=919939, Supplier 1=Digi-Key, Termination=SMD/SMT, Thickness=0.035inch, Voltage Rating (DC)=25V, Width=0.031inch
C39: library part GRM1555C1E330JA01D, "CAP CER 33PF 25V C0G/NP0 0402", Case Code (Imperial)=0402, Case Code (Metric)=1005, Dielectric=C0G, LCSC Part Number=C441758, Manufacturer=Murata, Max Operating Temperature=125°C, Min Operating Temperature=-55°C, Package Quantity=1, Supplier Part Number 1=490-6177-1-ND, Tolerance=5%, Voltage=25V, Capacitance=33pF, Case/Package=0402, ComponentLink1Description=https://www.murata.com/~/media/webrenewal/support/library/catalog/products/capacitor/mlcc/c02e.ashx?la=en-us&src-supplier=Digi-Key, ComponentLink1URL=https://www.murata.com/~/media/webrenewal/support/library/catalog/products/capacitor/mlcc/c02e.ashx?la=en-us&src-supplier=Digi-Key, ComponentLink2Description=http://www.mouser.com/ds/2/281/c02e-2905.pdf?src-supplier=Mouser, ComponentLink2URL=http://www.mouser.com/ds/2/281/c02e-2905.pdf?src-supplier=Mouser, ComponentLink3Description=http://psearch.murata.com/capacitor/product/GRM1555C1E330JA01%23.pdf?src-supplier=Avnet, ComponentLink3URL=http://psearch.murata.com/capacitor/product/GRM1555C1E330JA01%23.pdf?src-supplier=Avnet, Construction=Flat, Depth=0.5mm, Height=0.5mm, Lead Free="Lead Free", Length=1mm, Manufacturer Part Number=GRM1555C1E330JA01D, Mount="Surface Mount", Packaging="Tape and Reel", Pricing 1="1=0.1, 10=0.034, 50=0.0184, 100=0.0151, 500=0.01078, 1000=0.00847, 2500=0.0077, 5000=0.00708 (USD)", Radiation Hardening=No, RoHS Compliant=Yes, Series=GRM, Stock 1=250773, Supplier 1=Digi-Key, Termination=SMD/SMT, Thickness=0.022inch, Voltage Rating=25V, Voltage Rating (DC)=25V, Width=0.02inch
C42 C43: library part CC0603JRNPO9BN200, "CAP CER 20PF 50V C0G/NPO 0603", Case Code (Imperial)=0603, Case Code (Metric)=1608, Dielectric=C0G, LCSC Part Number=C105621, Manufacturer=Yageo, Max Operating Temperature=125°C, Min Operating Temperature=-55°C, Package Quantity=4000, Supplier Part Number 1=311-1424-6-ND, Tolerance=5%, Voltage Rating=50V, Capacitance=20pF, Case/Package=0603, ComponentLink1Description=http://www.farnell.com/datasheets/1132289.pdf?src-supplier=Element14, ComponentLink1URL=http://www.farnell.com/datasheets/1132289.pdf?src-supplier=Element14, ComponentLink2Description=http://www.yageo.com/documents/recent/UPY-GP_NP0_16V-to-50V_16.pdf?src-supplier=Digi-Key, ComponentLink2URL=http://www.yageo.com/documents/recent/UPY-GP_NP0_16V-to-50V_16.pdf?src-supplier=Digi-Key, Composition=Ceramic, Depth=0.8mm, Lead Free="Lead Free", Length=1.6mm, Manufacturer Part Number=CC0603JRNPO9BN200, Mount="Surface Mount", Number of Pins=2, Packaging="Tape and Reel", Pricing 1="1=0.1, 10=0.048, 100=0.0214, 500=0.01526, 1000=0.01198 (USD)", REACH SVHC=Unknown, Stock 1=259568, Supplier 1=Digi-Key, Termination=SMD/SMT, Thickness=0.035inch, Voltage Rating (DC)=50V, Weight=7.1E-05oz, Width=0.8mm
C50 C52: library part CC0603KRX5R7BB475, "CAP CER 4.7UF 16V X5R 0603", Case Code (Imperial)=0603, Case Code (Metric)=1608, Dielectric=X5R, LCSC Part Number=C277476, Manufacturer=Yageo, Max Operating Temperature=85°C, Min Operating Temperature=-55°C, Resistor Type=Ceramic, Supplier Part Number 1=311-1785-1-ND, Tolerance=10%, Voltage Rating=16V, Capacitance=4.7uF, Case/Package=0603, Category="Ceramic Capacitors", ComponentLink1Description=http://www.mouser.com/ds/2/447/UPY-GPHC_X5R_4V-to-50V_25-1131599.pdf?src-supplier=Mouser, ComponentLink1URL=http://www.mouser.com/ds/2/447/UPY-GPHC_X5R_4V-to-50V_25-1131599.pdf?src-supplier=Mouser, ComponentLink2Description=http://www.yageo.com/documents/recent/UPY-GPHC_X5R_4V-to-50V_25.pdf?src-supplier=Digi-Key, ComponentLink2URL=http://www.yageo.com/documents/recent/UPY-GPHC_X5R_4V-to-50V_25.pdf?src-supplier=Digi-Key, Depth=0.8mm, Halogen Free="Halogen Free", Height=0.8mm, Lead Free="Lead Free", Length=1.6mm, Manufacturer Part Number=CC0603KRX5R7BB475, Mount="Surface Mount", Packaging="Tape and Reel", Pricing 1="1=0.20000, 10=0.13800, 50=0.08280, 100=0.06990, 500=0.04784, 1000=0.04233 (USD)", RoHS=Yes, RoHS Compliant=Yes, Series=CC, Stock 1=547703, Supplier 1=Digi-Key, Termination=SMD/SMT, Thickness=0.037inch, Voltage Rating (DC)=16V, Weight=7.1E-05oz, Width=0.8mm
C53: library part 25SVPF47M, "CAP ALUM POLY 47UF 20% 25V SMD", Capacitor Type=Aluminium, Case/Package=2626, ESR (Equivalent Series Resistance)=30mR, LCSC Part Number=C136280, Leakage Current=235uA, Manufacturer=Panasonic, Max Operating Temperature=105°C, Min Operating Temperature=-55°C, Package Shape=Cylindrical, Package Style=SMTMeter, Rated DC Voltage (URdc)=25V, Ripple Current=140mA, Tolerance  (fill in as +-)=20%, Category="Polymer Capacitors", ComponentLink1Description=https://datasheet.ciiva.com:443/pdfs/VipMasterIC/IC/PANA/PANA-S-A0008969958/PANA-S-A0008969958-1.pdf?src-supplier=IHS+Markit, ComponentLink1URL=https://datasheet.ciiva.com:443/pdfs/VipMasterIC/IC/PANA/PANA-S-A0008969958/PANA-S-A0008969958-1.pdf?src-supplier=IHS+Markit, ComponentLink2Description=https://datasheet.ciiva.com/48542/svpf-eng-ds-48542390.pdf?src-supplier=Distrelec, ComponentLink2URL=https://datasheet.ciiva.com/48542/svpf-eng-ds-48542390.pdf?src-supplier=Distrelec, ComponentLink3Description=https://datasheet.ciiva.com/25746/1734360-25746558.pdf?src-supplier=Farnell, ComponentLink3URL=https://datasheet.ciiva.com/25746/1734360-25746558.pdf?src-supplier=Farnell, ComponentLink4Description=https://datasheet.ciiva.com/22746/1734360-22746218.pdf?src-supplier=Element14, ComponentLink4URL=https://datasheet.ciiva.com/22746/1734360-22746218.pdf?src-supplier=Element14, ComponentLink5Description=https://datasheet.ciiva.com/24025/svpf-os-262415-24025725.pdf?src-supplier=Mouser, ComponentLink5URL=https://datasheet.ciiva.com/24025/svpf-os-262415-24025725.pdf?src-supplier=Mouser, Dielectric Material=Aluminium, Height=5.9mm, Item Type=Capacitor, Length=7.3mm, Manufacturer Part Number=25SVPF47M, Mounting Technology="Surface Mount", Packaging="Tape and Reel", Pins=2, Polarity=Polarized, Pricing 1="1000=0.43572, 2000=0.42658, 4000=0.41744, 6000=0.40830, 8000=0.39916 (USD)", Reach SVHC Compliant=Yes, RoHS=Yes, RoHS Compliant=Yes, Stock 1=1000, Supplier 1=Avnet, Supplier Part Number 1=25SVPF47M, Tan Delta=0.12, Termination=Flat, Tolerance (fill in as +-)=20%, Width=6.6mm
Cx3 Cx4: library part CC0805KKX5R9BB225, "CAP CER 2.2UF 50V X5R 0805", Case Code (Imperial)=0805, Case Code (Metric)=2012, Dielectric=X5R, LCSC Part Number=C326581, Manufacturer=Yageo, Max Operating Temperature=85°C, Min Operating Temperature=-55°C, Package Quantity=3000, Resistor Type=Ceramic, Supplier Part Number 1=603-CC805KKX5R9BB225, Tolerance=10%, Voltage Rating=50V, Case/Package=0805, Category="Ceramic Capacitors", ComponentLink1Description=http://www.mouser.com/ds/2/447/Yageo_UPY-GP_NP0_16V-to-50V_9-358835.pdf?src-supplier=Mouser, ComponentLink1URL=http://www.mouser.com/ds/2/447/Yageo_UPY-GP_NP0_16V-to-50V_9-358835.pdf?src-supplier=Mouser, ComponentLink2Description=http://www.yageo.com/documents/recent/UPY-GPHC_X5R_4V-to-50V_25.pdf?src-supplier=Digi-Key, ComponentLink2URL=http://www.yageo.com/documents/recent/UPY-GPHC_X5R_4V-to-50V_25.pdf?src-supplier=Digi-Key, Halogen Free="Halogen Free", Item Type=Capacitor, Lead Free="Lead Free", Length=0.079inch, Manufacturer Part Number=CC0805KKX5R9BB225, Mounting Technology="Surface Mount", Packaging="Tape and Reel", Pricing 1="1=0.26000, 10=0.12100, 50=0.12100, 100=0.08700, 1000=0.06700, 10000=0.05000 (USD)", RoHS=Yes, RoHS Compliant=Yes, Stock 1=3880, Supplier 1=Mouser, Termination=SMD/SMT, Thickness=0.057inch, Voltage Rating (DC)=50V, Weight=0.000194oz, Width=1.25mm
D1 D2 D3 D17 D18: "TVS DIODE 5VWM 6.3VC DSN0603-2", LCSC Part Number=C477989, Manufacturer=Nexperia, Category="ESD and Circuit Protection ICs", ComponentLink1Description=http://www.farnell.com/datasheets/1961312.pdf?src-supplier=Farnell, ComponentLink1URL=http://www.farnell.com/datasheets/1961312.pdf?src-supplier=Farnell, ComponentLink2Description=https://assets.nexperia.com/documents/data-sheet/PESD5V0H1BSF.pdf?src-supplier=Digi-Key, ComponentLink2URL=https://assets.nexperia.com/documents/data-sheet/PESD5V0H1BSF.pdf?src-supplier=Digi-Key, ComponentLink3Description=http://www.farnell.com/datasheets/1961312.pdf?src-supplier=Newark, ComponentLink3URL=http://www.farnell.com/datasheets/1961312.pdf?src-supplier=Newark, Item Type=Diode, Manufacturer Part Number=PESD5V0H1BSFYL, Pricing 1="18000=0.06453, 36000=0.06278, 54000=0.06104, 90000=0.05930, 180000=0.05755, 900000=0.05581, 1800000=0.05406 (USD)", RoHS=Yes, RoHS Compliant=Yes, Stock 1=9000, Supplier 1=Avnet, Supplier Part Number 1=PESD5V0H1BSFYL
D4 D5: "16A 20V 7V 5V@Max Unidirectional SOT-23 TVS ROHS", LCSC Part Number=C239643, Manufacturer=WILLSEMI, Package=SOT-23, ComponentLink1Description=LCSC, ComponentLink1URL=https://www.lcsc.com/product-detail/TVS_WILLSEMI-Will-Semicon-ESD5302F-3-TR_C239643.html, Item Type=Diode, Manufacturer Part Number=ESD5302F-3/TR
D6: "0.5mA@40V 40V Single 3A 0.55V@3A SMA(DO-214AC) Schottky Barrier Diodes (SBD) ROHS", LCSC Part Number=C8678, Manufacturer=MDD, Package=SMA(DO-214AC), ComponentLink1Description=LCSC, ComponentLink1URL=https://www.lcsc.com/product-detail/Schottky-Barrier-Diodes-SBD_MDD-Microdiode-Electronics-SS34_C8678.html, Item Type=Diode, Manufacturer Part Number=SS34
D7: "20V 500mV@3A 3A SMA(DO-214AC) Schottky Barrier Diodes (SBD) ROHS", LCSC Part Number=C34897, Manufacturer=MDD, Manufacturer Part Number=SS32, Package=SMA(DO-214AC), ComponentLink1Description=LCSC, ComponentLink1URL=https://www.lcsc.com/product-detail/Schottky-Barrier-Diodes-SBD_MDD-Microdiode-Electronics-SS32_C34897.html, Item Type=Diode